# Altium PCB Stepper Board-v1.0.PcbDoc (part 5 of 8)
Units mil, origin at the board's own origin, x right, y up, seen from the top; angles counter-clockwise.
Board outline 6225.19 x 6531 mil, 4 copper layers (Top Layer, Layer-1, Layer-2, Bottom Layer), stack 61.654 mil thick; 410 components, 372 nets, 1464 pads, 1083 vias.
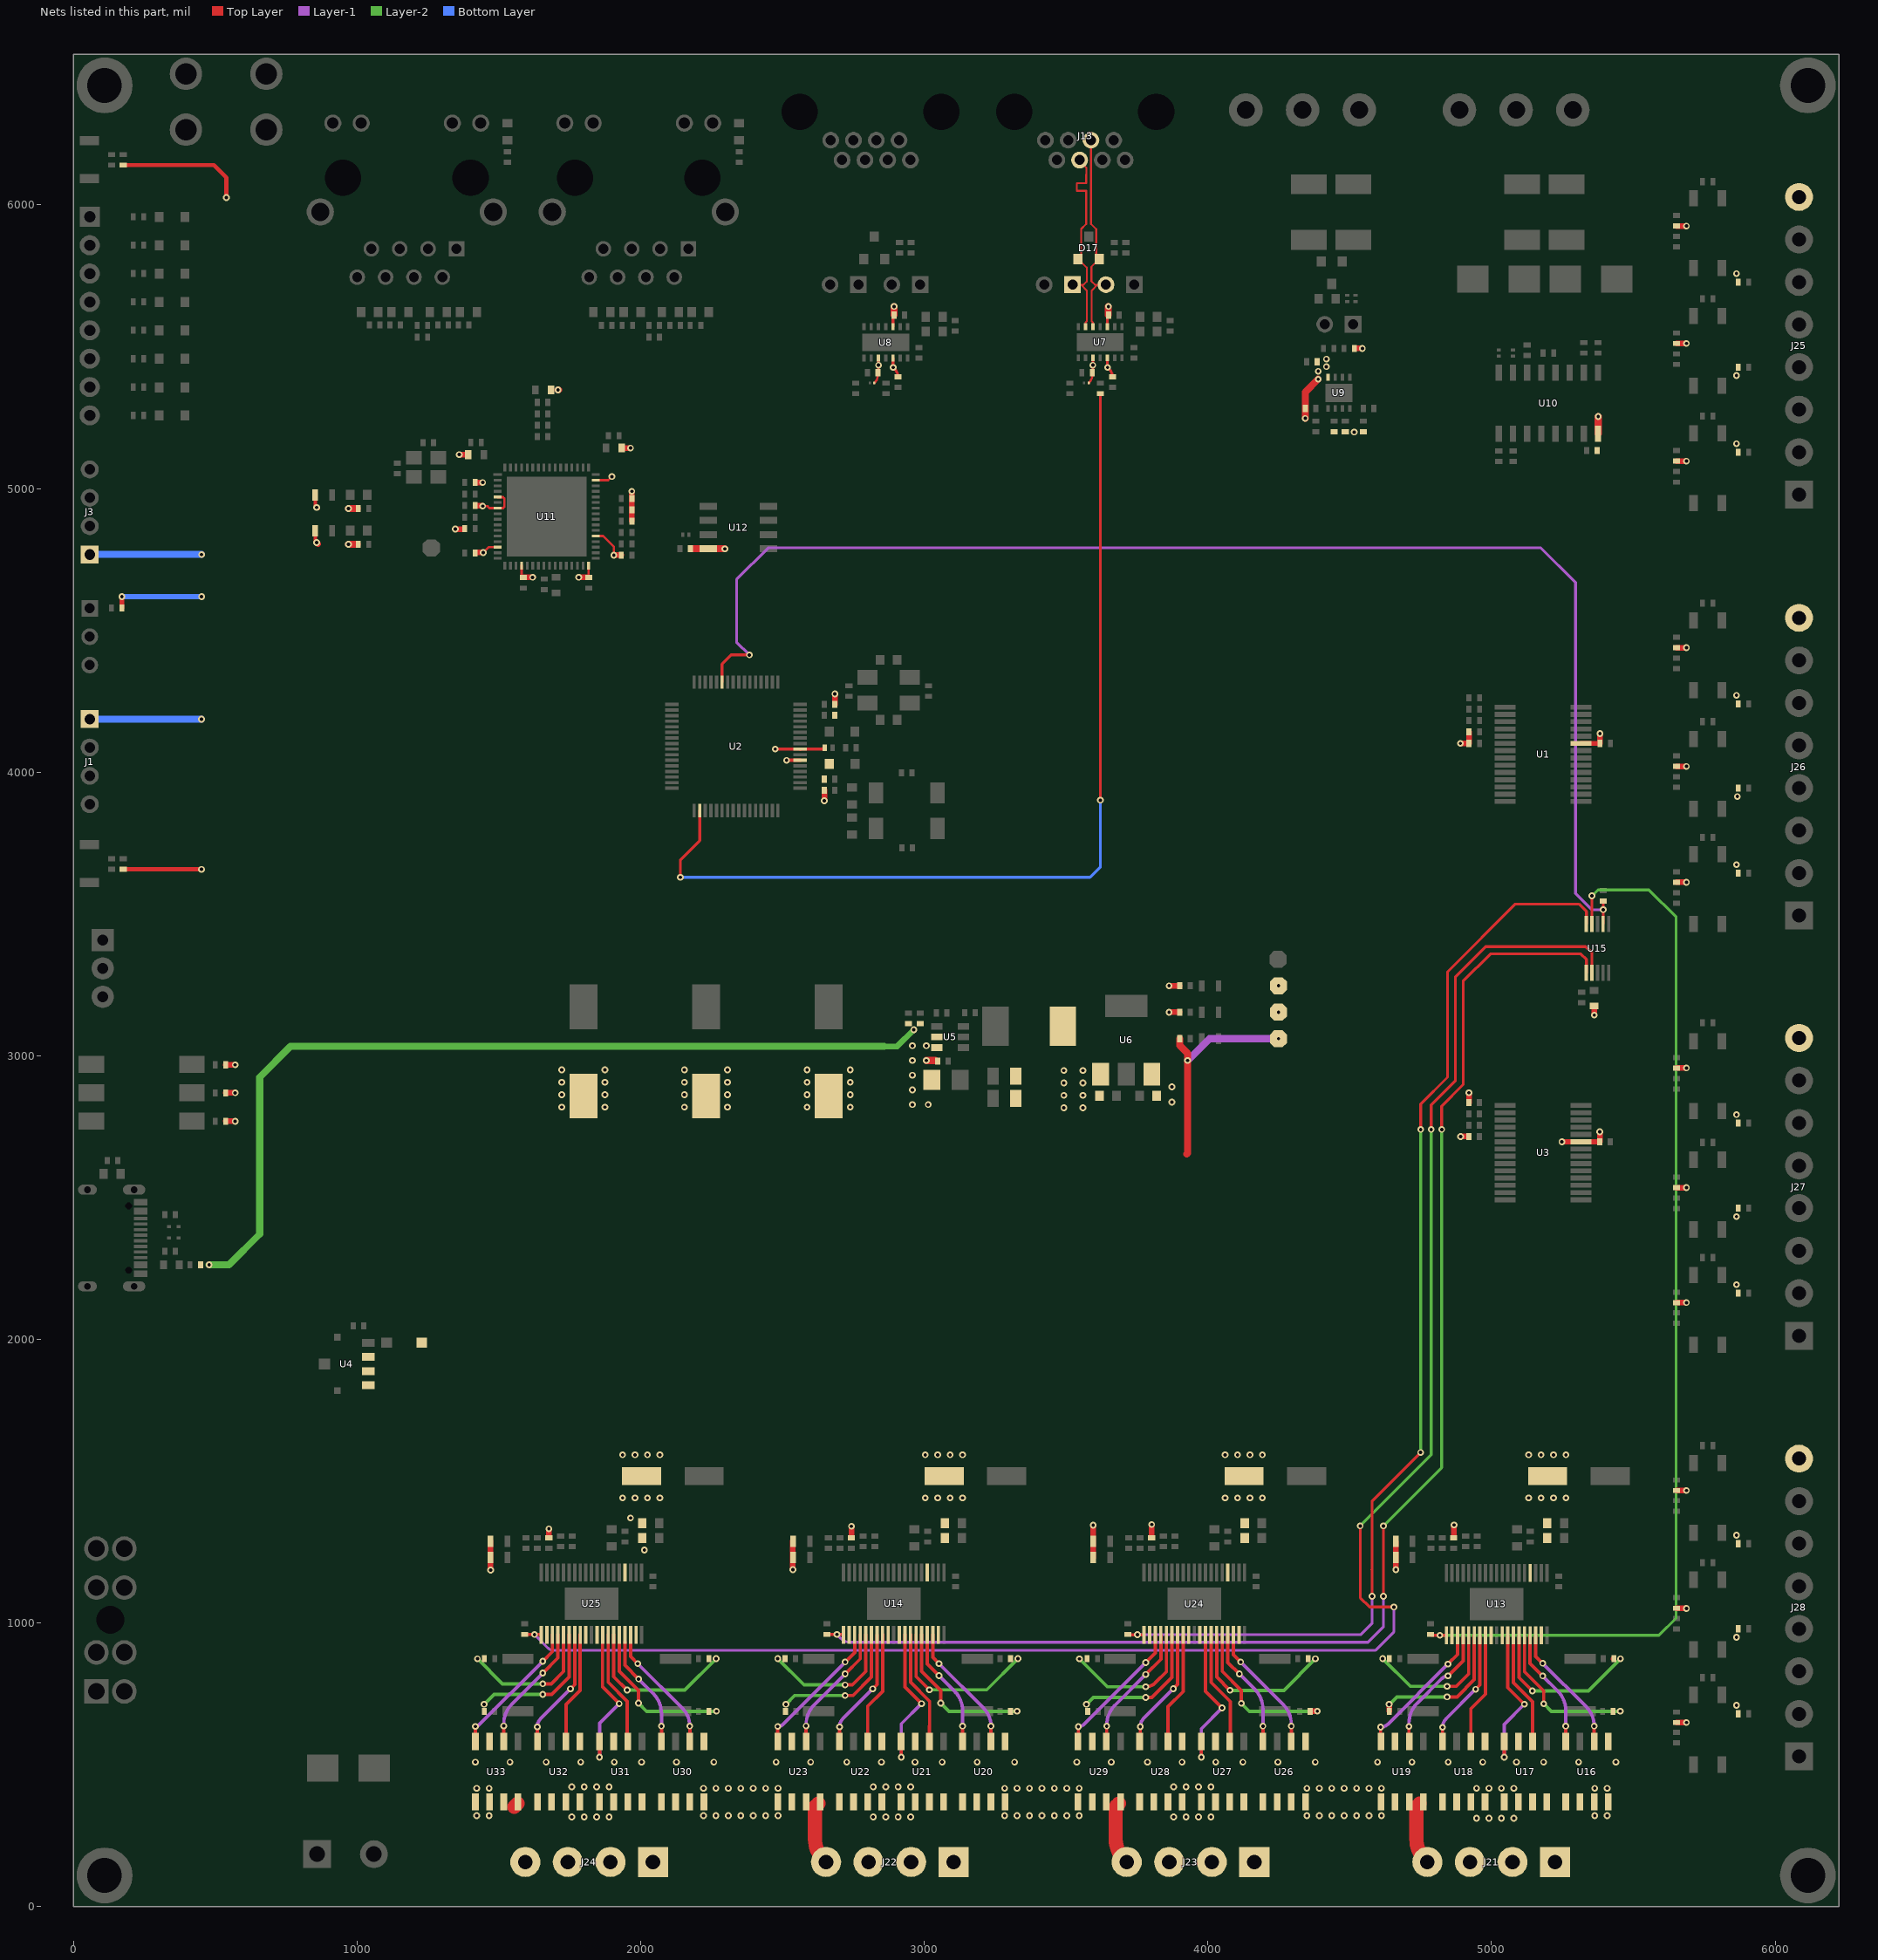
[diagram p4: the nets of this part, all layers, seen from the top]

## Part data (continued)
U34 U35 U36 U37 U38 U39 U40 U41 U42 U43 U44 U45: "Optoisolator Transistor Output 3750Vrms 1 Channel", Case/Package=SMD/SMT, Collector Emitter Saturation Voltage=200mV, Collector Emitter Voltage (VCEO)=80V, Current Transfer Ratio=600%, Forward Current=50mA, Forward Voltage=1.4V, Isolation Voltage=3.75kV, LCSC Part Number=C84196, Manufacturer=Isocom, Max Operating Temperature=100°C, Min Operating Temperature=-55°C, Power Dissipation=170mW, Reverse Breakdown Voltage=6V, Category=Optocouplers, ComponentLink1Description=https://datasheet.ciiva.com/26895/getdatasheetpartid-624485-26895717.pdf?src-supplier=Verical, ComponentLink1URL=https://datasheet.ciiva.com/26895/getdatasheetpartid-624485-26895717.pdf?src-supplier=Verical, ComponentLink2Description=https://datasheet.ciiva.com/29301/183289-da-01-en-optokoppler-is181-gb-29301106.pdf?src-supplier=Conrad, ComponentLink2URL=https://datasheet.ciiva.com/29301/183289-da-01-en-optokoppler-is181-gb-29301106.pdf?src-supplier=Conrad, Fall Time=18000ns, Item Type=Optocoupler, Lead Free="Lead Free", Manufacturer Part Number=IS181GB, Mount="Surface Mount", Number of Elements=1, Number of Pins=4, Pricing 1="1=0.55080, 10=0.34190, 25=0.33860, 50=0.33530, 100=0.19360, 250=0.19160, 500=0.18960, 1000=0.14750 (USD)", Radiation Hardening=No, Rise Time=18000ns, RoHS=Yes, RoHS Compliant=Yes, Stock 1=2922, Supplier 1="Arrow Electronics", Supplier Part Number 1=IS181GB
X1: library part "MC-306 32.7680K-A0:ROHS", "32.768kHz 12.5pF ±20ppm MC-306 Crystals ROHS", LCSC Part Number=C2650464, Manufacturer="Seiko Epson", ComponentLink1Description=LCSC, ComponentLink1URL=https://www.lcsc.com/product-detail/Crystals_Seiko-Epson-MC-306-32-7680K-A0-ROHS_C2650464.html, Item Type=Crystal, Manufacturer Part Number="MC-306 32.7680K-A0:ROHS"
X2: library part 5TJ480000XYLBC, "8MHz 18pF ±10ppm SMD5032-4P Crystals ROHS", LCSC Part Number=C2149247, Manufacturer=JYJE, Package=SMD5032-4P, ComponentLink1Description=LCSC, ComponentLink1URL=https://www.lcsc.com/product-detail/Crystals_JYJE-5TJ480000XYLBC_C2149247.html, Item Type=Crystal, Manufacturer Part Number=5TJ480000XYLBC
X3: library part X322525MRB4SI, "25MHz 贴片晶振 18pF ±10ppm ±20ppm SMD3225-4P Crystals ROHS", LCSC Part Number=C70593, Manufacturer=YXC, Item Type=Crystal, Manufacturer Part Number=X322525MRB4SI, RoHS=No, Supplier=LCSC

## Free pads (board coordinates)
  round 196.85 hole 122.05: MH1(109.33,6421.57) MH1(109.33,109.43) MH1(6115.86,6421.57) MH1(6115.86,109.43)

## Via types
v1: diameter 23.62, hole 11.81, Top Layer to Bottom Layer, 1081 vias
v2: diameter 23.62, hole 11.81, Top Layer to Bottom Layer, tented both sides, 2 vias

## Nets (pads, with @x,y where several pads share a name; then routed paths per layer and width w, separated by ;. In a path a pad name is that pad's centre, name@x,y a point inside that pad or via, vN(x,y) a via of type N, cw(c..) or ccw(c..) an arc to the next point about the centre after c; other vN are vias at no path point)
+3V3: C5.2 C6.2 C7.2 C8.2 C22.2 C24.2 C26.2 C29.2 C34.2 C43.2 C45.2 C47.2 C49.2 C51.2 C52.2 C53.2 D2.1 FB2.1 FB3.1 FB4.1 FB6.2 J1.1 J3.1 L1.1 LED4.1 LED5.1 LED6.1 LED7.1 LED8.1 LED9.1 LED10.1 LED11.1 LED12.1 LED13.1 R1.2 R7.2 R8.2 R12.2 R13.2 R17.2 R18.2 R21.2 R31.2 R32.2 R33.2 R39.1 R58.2 R59.2 R60.2 R61.2 R63.1 R71.2 R72.2 R73.1 R76.1 R77.1 R91.2 R95.2 R97.1 R98.1 R112.1 R113.1 TP3.1 U1.9 U2.6 U2.8 U3.9 U6.3 U7.5 U8.5 U9.8 U10.16 U11.5 U11.7 U11.14 U11.20 U11.32 U11.37 U11.47 U12.8 | length 4736.4
  Top Layer w8: C52.2@1416.05,5018.02 C52.2@1416.05,5021.52 ; v1(1442.7,4938.22) 1443.08,4937.84 1460,4937.84 1466.79,4931.05 U11.7@1495.32,4931.05 1514.12,4931.05 1518.8,4935.74 1518.8,4964.86 1514.12,4969.54 1496.2,4969.54 U11.5@1495.32,4970.42 ; v1(1444.55,4774.25) 1463.55,4793.25 U11.14@1495.32,4793.25 ; C43.2@1579.97,4687.61 U11.20@1579.97,4728.29 ; C45.2@1816.19,4687.38 U11.32@1816.19,4728.29 ; U11.37@1841.78,4832.62 1867.27,4832.62 1905.38,4794.51 v1(1905.38,4765) ; U11.47@1841.78,5029.48 1885.21,5029.48 v1(1898.01,5042.27)
  Top Layer w10: U2.8@2562.37,4081.16 2640.32,4081.16 2646.22,4087.06 L1.1@2646.22,4091 ; U8.5@2889.51,5460.37 2889.51,5428.63 ccw(c2891.84,5428.63) v1(2890.19,5426.98) 2895.73,5421.44 cw(c2868.06,5393.77) C26.2@2907.19,5393.77 ; C26.2@2909.19,5394.77 C26.2@2909.19,5395.75 ; v1@3645.59,5428.84 U7.5@3645.59,5460.58 ; v1(3646.28,5427.19) 3651.82,5421.65 cw(c3624.15,5393.98) C24.2@3663.28,5393.98
  Top Layer w12: v1@853.02,4814.34 LED5.1@853.02,4851.52 ; LED4.1@853.02,4977.52 853.02,4940.34 v1@863.84,4929.52 ; v1@2474,4082 2474.75,4081.25 2562.28,4081.25 U2.8@2562.37,4081.16 ; v1(2514.1,4041.79) U2.6@2562.37,4041.79
  Top Layer w15: R33.2@175,3657.5 175.25,3657.25 v1(451,3657.25) ; R77.1@175,6140.5 494.5,6140.5 539,6096 v1(539,6026)
  Top Layer w18: R1.2@170.62,4578.41 v1(170.62,4619) ; v1(5248.27,2696.68) U3.9@5315.68,2696.68 C6.2@5381.89,2696.68 ; U1.9@5315.68,4101.24 C5.2@5382.33,4101.24
  Top Layer w20: R32.2@536.5,2769 v1(570,2769) ; R31.2@536.5,2869 v1(570,2869) ; R21.2@536.5,2968 v1(570,2968) ; v1(857.02,4809.52) v1@863.02,4803.52 ; v1(1346.4,4857.03) R73.1@1376.7,4857.03 ; v1(1360.07,5119.81) 1360.07,5119.35 FB3.1@1391.54,5119.35 ; C51.2@1417.05,4938.91 v1@1442,4938.91 ; C47.2@1417.31,4774.25 v1@1441.55,4774.25 ; C52.2@1418.41,5021.52 v1(1442.7,5021.52) ; v1(1470.47,1186) LED12.1@1470.47,1230.54 LED13.1@1470.47,1288 ; C43.2@1586.55,4687.02 v1(1618.85,4687.02) v1@1620.85,4687.02 ; R113.1@1676.06,1304.13 v1(1676.06,1331.93) ; FB4.1@1682.8,5348.76 FB4.1@1683.56,5348 ; v1(1781.25,4687.02) C45.2@1815.55,4687.02 ; v1(1905.38,4765) C49.2@1931.5,4765 ; FB2.1@1932.56,5143 v1(1964.04,5143) ; R71.2@1968.5,4885 R72.2@1968.5,4925 R76.1@1968.5,4965 v1(1968.5,4990.11) ; v1(2536.47,1187.81) LED9.1@2536.47,1288 ; v1@2647.5,3899.11 C8.2@2647.5,3936.11 ; R18.2@2684.5,4239 v1@2684.5,4276 ; 2743.06,1309 v1(2743.06,1340.93) ; v1(3595.32,1344.73) 3595.32,1291.85 3595.9,1291.28 LED10.1@3595.9,1230.54 ; 3801.89,1309 v1(3801.89,1346.93) ; v1(3863,3246.55) R39.1@3900.5,3246.54 ; 4525.75,5494.22 v1(4544.68,5494.22) ; v1(4662.47,1187.81) LED7.1@4662.47,1286.02 ; R97.1@4867.89,1307.68 v1(4867.89,1345.6) ; v1(4890.49,4101.51) R7.2@4920.83,4101.51 R8.2@4920.83,4141.6 ; v1(4891,2715) R12.2@4920.26,2715 ; R13.2@4920.39,2834.63 v1(4920.39,2869.56) ; v1(5362.29,3143) 5362.29,3173.56 FB6.2@5363.79,3175.06 ; C6.2@5381.89,2696.68 v1(5381.89,2731.61) ; C5.2@5382.33,4101.24 v1(5382.33,4136.17)
  Top Layer w25: v1(969.52,4803.52) R95.2@1000.05,4803.52 ; v1(969.52,4929.52) R91.2@1000.05,4929.52 ; v1(1708.19,5348) v1@1710,5348 ; 2184.06,4787.52 U12.8@2238.25,4787.52 v1(2296.57,4787.52) ; v1(4343.26,5247.47) R58.2@4343.26,5282.43 4343.26,5340.2 v1(4388.73,5385.67) ; U10.16@5376.26,5194.19 v1(5376.26,5254)
  Bottom Layer w18: v1(170.62,4619) v1(451.47,4619)
  Bottom Layer w25: J1.1@57,4187 v1(451,4187) ; J3.1@57,4767.53 v1(451.47,4767.53)
  other v1: 3873.17,2836.15 3873.17,2890.16 4249,3246.54 2647.35,3899.11 2474,4081.25 2684.65,4276 857.02,4933.52 4516,5199 4388.73,5413.67 4417.73,5429.67 4417.73,5456.67
+5V: C18.2 C19.2 C20.2 C21.2 C23.1 C25.1 D15.1 D16.1 L2.2 NT17.1 NT18.1 NT19.1 NT20.1 NT21.1 NT22.1 NT23.1 NT24.1 NT25.1 NT26.1 NT27.1 NT28.1 R22.2 R35.2 R38.1 R42.1 R43.1 R132.2 R133.2 R134.2 R135.2 R136.2 R137.2 R150.2 R151.2 R152.2 R153.2 R154.2 R155.2 TP2.1 U6.1 U7.3 U7.10 U8.3 U8.10 | length 3910.7
  Top Layer w8: D16.1@2823.87,5372.05 ccw(c2793.39,5402.53) C25.1@2836.5,5402.53 ; D15.1@3579.96,5372.26 ccw(c3549.48,5402.74) C23.1@3592.59,5402.74
  Top Layer w10: C25.1@2838.32,5409.69 v1(2838.32,5435.03) U8.3@2838.32,5460.37 ; U8.10@2889.51,5570.61 2889.51,5601.59 cw(c2903.79,5601.59) R43.1@2893.69,5611.69 ; C23.1@3594.41,5409.89 U7.3@3594.41,5460.58 ; U7.10@3645.59,5570.81 R42.1@3645.59,5601.8
  Top Layer w20: v1(3863,3153.28) R38.1@3900.5,3153.27 ; R153.2@5652.39,648.79 v1(5687.31,648.79) ; R154.2@5652.39,1051 v1(5687.31,1051) ; R155.2@5652.39,1466.79 v1(5687.31,1466.79) ; R150.2@5652.39,2129.29 v1(5687.31,2129.29) ; R151.2@5652.39,2534.79 v1(5687.31,2534.79) ; R152.2@5652.39,2956.79 v1(5687.31,2956.79) ; R135.2@5652.39,3611.79 v1(5687.31,3611.79) ; R136.2@5652.39,4020.29 v1(5687.31,4020.29) ; R137.2@5652.39,4438.79 v1(5687.31,4438.79) ; R132.2@5652.39,5096.79 v1(5687.31,5096.79) ; R133.2@5652.39,5511.79 v1(5687.31,5511.79) ; R134.2@5652.39,5925.79 v1(5687.31,5925.79)
  Top Layer w25: R43.1@2893.19,5612.19 v1(2893.19,5642) ; R42.1@3649,5612.19 v1(3649,5642)
  Layer-2 w10: v1@2838.24,5434.94 v1(2838.32,5435.03)
  Layer-2 w20: 2858,3033 2904.31,3033 v1(2962.92,3091.6)
  Layer-2 w25: v1(478,2263) 548,2263 656.24,2371.25 656.24,2924.24 765,3033 2858,3033
  other v1: 5863.89,709.22 5863.89,949.36 5863.89,1309.22 5863.89,2192.55 5863.89,2432.7 5863.89,2792.22 3492.03,2816.52 3559.25,2816.52 3492.03,2860.35 3559.25,2860.35 3492.03,2904.18 3559.25,2904.18 3492.03,2948.01 3559.25,2948.01 4249,3153.27 5863.89,3673.89 5866.89,3914.03 5863.89,4270.89 5863.89,5158.22 5863.89,5398.36 3594.32,5435.03 5863.89,5758.22
+24V: C12.1 C13.1 C14.1 C15.2 C16.2 C72.1 C73.1 C74.2 C75.2 C76.2 C77.2 C87.1 C88.1 C89.2 C90.2 C91.2 C92.2 D13.2 J25.8 J26.8 J27.8 J28.8 R37.1 TP1.1 U4.1 U4.2 U4.3 U5.2 U5.3 U13.4 U14.4 U16.7 U16.8 U17.5 U17.6 U18.7 U18.8 U19.5 U19.6 U20.7 U20.8 U21.5 U21.6 U22.7 U22.8 U23.5 U23.6 U24.4 U25.4 U26.7 U26.8 U27.5 U27.6 U28.7 U28.8 U29.5 U29.6 U30.7 U30.8 U31.5 U31.6 U32.7 U32.8 U33.5 U33.6 | length 803.7
  Top Layer w25: v1(3007.21,2983.32) C16.2@3038.53,2983.32 ; R37.1@3900.5,3060 3900.5,3036.54 3928.5,3008.54 v1(3928.5,2983.04) 3928.5,2656.5 3925,2653
  Layer-1 w25: v1(3928.5,2983.04) 4005.46,3060 v1(4249,3060)
  other v1: 4947.01,311.08 4990.84,311.08 5034.67,311.08 5078.5,311.08 1756.67,315.78 1800.5,315.78 1844.33,315.78 1888.16,315.78 2820.01,315.78 2863.84,315.78 2907.67,315.78 2951.5,315.78 3879.01,315.78 3922.84,315.78 3966.67,315.78 4010.5,315.78 1421.36,320.47 1465.19,320.47 2221.19,320.47 2265.02,320.47 2308.85,320.47 2352.68,320.47 2396.51,320.47 2440.34,320.47 2484.17,320.47 3283.19,320.47 3327.02,320.47 3370.85,320.47 3414.68,320.47 3458.51,320.47 3502.34,320.47 3546.17,320.47 4349.19,320.47 4393.02,320.47 4436.85,320.47 4480.68,320.47 4524.51,320.47 4568.34,320.47 4612.17,320.47 5363.81,320.47 5407.64,320.47 1421.36,416.93 1465.19,416.93 2221.19,416.93 2265.02,416.93 2308.85,416.93 2352.68,416.93 2396.51,416.93 2440.34,416.93 2484.17,416.93 3283.19,416.93 3327.02,416.93 3370.85,416.93 3414.68,416.93 3458.51,416.93 3502.34,416.93 3546.17,416.93 4349.19,416.93 4393.02,416.93 4436.85,416.93 4480.68,416.93 4524.51,416.93 4568.34,416.93 4612.17,416.93 4947.01,416.93 4990.84,416.93 5034.67,416.93 5078.5,416.93 5363.81,416.93 5407.64,416.93 1756.67,421.63 1800.5,421.63 1844.33,421.63 1888.16,421.63 2820.01,421.63 2863.84,421.63 2907.67,421.63 2951.5,421.63 3879.01,421.63 3922.84,421.63 3966.67,421.63 4010.5,421.63 2013,1257 1963.91,1369.75 1936.14,1440.52 1979.97,1440.52 2023.8,1440.52 2067.63,1440.52 3003.14,1440.52 3046.97,1440.52 3090.8,1440.52 3134.63,1440.52 4060.57,1440.52 4104.4,1440.52 4148.23,1440.52 4192.06,1440.52 5131.14,1440.52 5174.97,1440.52 5218.8,1440.52 5262.63,1440.52 1936.14,1592.52 1979.97,1592.52 2023.8,1592.52 2067.63,1592.52 3003.14,1592.52 3046.97,1592.52 3090.8,1592.52 3134.63,1592.52 4060.57,1592.52 4104.4,1592.52 4148.23,1592.52 4192.06,1592.52 5131.14,1592.52 5174.97,1592.52 5218.8,1592.52 5262.63,1592.52 1721.52,2818.89 1873.52,2818.89 2154.02,2818.89 2306.02,2818.89 2586.52,2818.89 2738.52,2818.89 2958.06,2827.52 3013.71,2827.52 1721.52,2862.72 1873.52,2862.72 2154.02,2862.72 2306.02,2862.72 2586.52,2862.72 2738.52,2862.72 2958.06,2879.46 1721.52,2906.55 1873.52,2906.55 2154.02,2906.55 2306.02,2906.55 2586.52,2906.55 2738.52,2906.55 2958.06,2931.39 1721.52,2950.38 1873.52,2950.38 2154.02,2950.38 2306.02,2950.38 2586.52,2950.38 2738.52,2950.38 2958.06,2983.32 2958.06,3035.26 3007.21,3035.26
A1HS-1: U13.36 U16.2 | length 455.9
  Top Layer w12: U13.36@5155.91,956.02 5155.91,882.15 v1(5180.64,857.41) ; U16.2@5362,581.3 v1(5362,636)
  Layer-1 w12: v1(5180.64,857.41) 5333.68,704.37 cw(c5265.31,636) v1(5362,636)
A1HS-2: U24.36 U26.2 | length 456.3
  Top Layer w12: U24.36@4089.91,957.35 4089.91,887.62 v1(4115.5,862.02) ; U26.2@4294,581.3 v1(4294,636)
  Layer-1 w12: v1(4115.5,862.02) 4264.71,712.81 cw(c4194,642.1) 4294,642.1 v1(4294,636)
A1HS-3: U14.36 U20.2 | length 457.8
  Top Layer w12: U14.36@3029.91,958 3029.91,878.38 v1(3052,856.28) ; U20.2@3235,581.3 v1(3235,636)
  Layer-1 w12: v1(3052,856.28) 3208.64,699.65 ; 3208.65,699.63 cw(c3144.99,636) v1(3235,636)
A1HS-4: U25.36 U30.2 | length 434
  Top Layer w12: U25.36@1963.91,932.5 1963.91,881.72 v1(1989.35,856.28) ; U30.2@2173,581.3 v1(2173,636)
  Layer-1 w12: v1(1989.35,856.28) 2147.1,698.53 cw(c2084.57,636) v1(2173,636)
A1LS-1: U13.35 U16.4 | length 422.5
  Top Layer w12: U13.35@5136.23,956.02 5136.23,857.41 v1(5180.64,813) ; U16.4@5262,581.3 v1(5262,636)
  Layer-1 w12: v1(5180.64,813) 5232.71,760.93 cw(c5162,690.22) 5262,690.22 v1(5262,636)
A1LS-2: U24.35 U26.4 | length 423
  Top Layer w12: U24.35@4070.23,957.35 4070.23,860.77 v1(4111,820) ; U26.4@4194,581.3 v1(4194,636)
  Layer-1 w12: v1(4111,820) 4164.71,766.29 cw(c4094,695.58) 4194,695.58 v1(4194,636)
A1LS-3: U14.35 U20.4 | length 424.1
  Top Layer w12: U14.35@3010.23,958 3010.23,855.77 v1(3052,814) ; U20.4@3135,581.3 v1(3135,636)
  Layer-1 w12: v1(3052,814) 3105.71,760.29 cw(c3035,689.58) 3127.55,727.45 cw(c3035,689.58) 3135,689.58 v1(3135,636)
A1LS-4: U25.35 U30.4 | length 400.2
  Top Layer w12: U25.35@1944.23,932.5 1944.23,850.44 v1(1992.52,802.14) ; U30.4@2073,581.3 v1(2073,636)
  Layer-1 w12: v1(1992.52,802.14) 2043.71,750.96 cw(c1973,680.25) 2073,680.25 v1(2073,636)
A2HS-1: U13.31 U17.4 | length 537.9
  Top Layer w12: v1(5044.67,526.6) U17.4@5044.67,581.3 ; U13.31@5057.49,956.02 5057.49,771.82 v1(5115.97,713.33)
  Layer-1 w12: v1(5044.67,526.6) 5044.67,642.03 v1(5115.97,713.33)
A2HS-2: U24.31 U27.4 | length 524.9
  Top Layer w12: v1@3976.67,528.58 U27.4@3976.67,568.18 ; U24.31@3991.49,957.35 3991.49,758.7 v1(4049.97,700.21)
  Layer-1 w12: v1(3976.67,526.6) 3976.67,626.9 v1(4049.97,700.21)
A2HS-3: U14.31 U21.4 | length 540.5
  Top Layer w12: v1@2918.67,528.58 U21.4@2918.67,583.28 ; U14.31@2931.49,958.68 U14.31@2931.49,958 2931.49,773.8 v1(2989.97,715.31)
  Layer-1 w12: v1(2918.67,526.6) 2918.67,644 v1(2989.97,715.31)
A2HS-4: U25.31 U31.4 | length 539
  Top Layer w10: 1865.49,773.8 U25.31@1865.49,958
  Top Layer w12: v1@1854.67,528.58 U31.4@1854.67,583.28 ; 1865.49,773.8 v1(1923.97,715.31)
  Layer-1 w12: v1(1854.67,526.6) 1854.67,646 v1(1923.97,715.31)
A2LS-1: U13.32 U17.2 | length 402.7
  Top Layer w12: U13.32@5077.17,956.02 5077.17,788.84 5144.67,721.33 U17.2@5144.67,581.3
A2LS-2: U24.32 U27.2 | length 402.7
  Top Layer w12: U24.32@4011.17,957.35 4011.17,790.16 4078.67,722.66 U27.2@4078.67,582.63
A2LS-3: U14.32 U21.2 | length 457.4
  Top Layer w12: U14.32@2951.17,958 2951.17,790.81 3018.67,723.31 U21.2@3018.67,583.28 ; U21.2@3017.67,581.3 3017.67,636
A2LS-4: U25.32 U31.2 | length 402.7
  Top Layer w12: U25.32@1885.17,958 1885.17,790.81 1952.67,723.31 U31.2@1952.67,583.28
AISENN-1: NT2.1 U13.33 | length 575
  Top Layer w12: U13.33@5096.86,956.02 5096.86,875.3 5096.86,807.17 v1(5144,760.02)
  Top Layer w20: NT2.1@5429.5,872.52 NT2.1@5430.5,873.52
  Layer-2 w12: v1(5144,760.02) 5341.5,760.02 v1(5455,873.52)
AISENN-2: NT10.1 U24.33 | length 561.6
  Top Layer w12: U24.33@4030.86,957.35 4030.86,809.49 v1(4078,762.35)
  Layer-2 w12: v1(4078,762.35) 4267.83,762.35 v1(4379,873.52)
AISENN-3: NT6.1 U14.33 | length 571.3
  Top Layer w12: U14.33@2970.86,958 2970.86,811.14 v1(3018,764)
  Layer-2 w12: v1(3018,764) 3220.17,764 v1(3330.17,874)
AISENN-4: NT14.1 U25.33 | length 574.7
  Top Layer w12: U25.33@1904.86,958 1904.86,810.14 v1(1952,763)
  Layer-2 w12: v1(1952,763) 2155.48,763 v1@2265.69,873.21
  Layer-2 w20: v1@2265.69,873.21 v1(2265.69,874)
AISENP-1: NT1.1 U13.34 | length 628
  Top Layer w10: 5115.97,877.4 U13.34@5115.97,955.46
  Top Layer w12: U13.34@5116.54,956.02 5116.54,827.49 5184,760.02 v1(5184,715.02)
  Layer-2 w12: v1(5184,715.02) 5210.54,688.48 v1(5454,688.48)
AISENP-2: NT9.1 U24.34 | length 573
  Top Layer w12: U24.34@4050.54,957.35 4050.54,828.81 4118,761.35 v1(4118,716.35)
  Top Layer w20: NT9.1@4361.5,688.48 v1(4386,688.48)
  Layer-2 w12: v1(4118,716.35) 4145.87,688.48 v1(4386,688.48)
AISENP-3: NT5.1 U14.34 | length 549.8
  Top Layer w12: U14.34@2990.54,958 2990.54,829.46 3058,762 v1(3058,717)
  Layer-2 w12: v1(3058,717) 3086.52,688.48 v1(3327,688.48)
AISENP-4: NT13.1 U25.34 | length 553.8
  Top Layer w12: U25.34@1924.54,958 1924.54,829.46 1992,762 v1(1992,717)
  Layer-2 w12: v1(1992,717) 2020.52,688.48 v1@2265,688.48
  other v1: 2267,688.48
AOUT1-1: J21.1 U13.37 U16.1 U16.5 U16.6
  other v1: 5307,509 5438.81,509
AOUT1-2: J23.1 U24.37 U26.1 U26.5 U26.6
  other v1: 4246.67,509 4378.48,509
AOUT1-3: J22.1 U14.37 U20.1 U20.5 U20.6
  other v1: 3186.34,509 3318.14,509
AOUT1-4: J24.1 U25.37 U30.1 U30.5 U30.6
  other v1: 2126,509 2257.81,509
AOUT2-1: J21.2 U13.30 U17.3 U17.7 U17.8
  other v1: 5087.83,509 5183.64,509
AOUT2-2: J23.2 U24.30 U27.3 U27.7 U27.8
  other v1: 4027.5,509 4123.3,509
AOUT2-3: J22.2 U14.30 U21.3 U21.7 U21.8
  other v1: 2967.16,509 3062.97,509
AOUT2-4: J24.2 U25.30 U31.3 U31.7 U31.8
  other v1: 1906.83,509 2002.64,509
B1HS-1: U13.27 U18.2 | length 394.7
  Top Layer w12: U18.2@4927.33,582.63 4927.33,697.33 4978.75,748.75 U13.27@4978.75,956.02
B1HS-2: U24.27 U28.2 | length 396.8
  Top Layer w12: U28.2@3859.33,582.63 3859.33,704.33 3912.75,757.75 U24.27@3912.75,957.35
B1HS-3: U14.27 U22.2 | length 397.8
  Top Layer w12: U22.2@2800.33,582.63 2800.33,706.33 2852.75,758.75 U14.27@2852.75,958.68
B1HS-4: U25.27 U32.2 | length 398.7
  Top Layer w12: U32.2@1735.67,581.3 1737,582.63 1737,713 1786.25,762.25 U25.27@1786.25,959
B1LS-1: U13.26 U18.4 | length 427.5
  Top Layer w12: U18.4@4827.33,581.3 v1(4827.33,632) ; v1(4944,766) 4959.06,781.06 U13.26@4959.06,956.02
  Layer-1 w12: v1(4827.33,632) cw(c4869.18,632) 4827.75,637.86 cw(c4869.18,632) 4839.59,661.59 v1(4944,766)
B1LS-2: U24.26 U28.4 | length 427.5
  Top Layer w12: U28.4@3761.33,583.12 v1(3761.33,633.83) ; v1(3878,767.83) 3893.06,782.88 U24.26@3893.06,957.85
  Layer-1 w12: v1(3761.33,633.83) cw(c3803.18,633.83) 3761.75,639.69 cw(c3803.18,633.83) 3773.59,663.42 v1(3878,767.83)
B1LS-3: U14.26 U22.4 | length 427.5
  Top Layer w12: U22.4@2701.33,582.78 v1(2701.33,633.48) ; v1(2818,767.48) 2833.06,782.53 U14.26@2833.06,957.5
  Layer-1 w12: v1(2701.33,633.48) cw(c2743.18,633.48) 2701.75,639.34 cw(c2743.18,633.48) 2713.59,663.07 v1(2818,767.48)
B1LS-4: U25.26 U32.4 | length 427.5
  Top Layer w12: U32.4@1635.33,582.78 v1(1635.33,633.48) ; v1(1752,767.48) 1767.06,782.53 U25.26@1767.06,957.5
  Layer-1 w12: v1(1635.33,633.48) cw(c1677.18,633.48) 1635.75,639.34 cw(c1677.18,633.48) 1647.59,663.07 v1(1752,767.48)
B2HS-1: U13.22 U19.4 | length 497.8
  Top Layer w12: U19.4@4609,580.02 v1(4609,632.72) v1@4609,634.72 ; v1(4846.73,855.02) 4880.33,888.62 U13.22@4880.32,956.02
  Layer-1 w12: v1(4609,632.72) ccw(c4609,669.98) 4635.34,643.64 v1(4846.73,855.02)
B2HS-2: U24.22 U29.4 | length 498.6
  Top Layer w12: U29.4@3543,581.35 v1(3543,634.05) v1@3543,636.05 ; v1(3780.73,860.35) 3814.33,893.94 U24.22@3814.32,957.35
  Layer-1 w12: v1@3545.44,635.06 cw(c3543,637.51) v1(3543,634.05) ccw(c3543,661.65) 3562.52,642.13 v1(3780.73,860.35)
B2HS-3: U14.22 U23.4 | length 469.9
  Top Layer w12: U23.4@2483,582 v1(2483,634.7) v1@2483,636.7 ; v1(2720.73,862) 2754.33,895.6 U14.22@2754.33,932.5
  Layer-1 w12: v1(2483,634.7) ccw(c2483,659.89) 2500.81,642.08 v1(2720.73,862)
B2HS-4: U25.22 U33.4 | length 492
  Top Layer w12: U33.4@1417,582 v1(1417,634.7) ; v1(1654.73,865) 1688.33,898.6 U25.22@1688.32,958
  Layer-1 w12: v1(1417,634.7) ccw(c1417,652.64) 1420.49,635.04 ccw(c1417,652.64) 1429.69,639.96 v1(1654.73,865)
B2LS-1: U13.23 U19.2 | length 456.9
  Top Layer w12: U19.2@4709,580.02 v1(4709,634.72) ; v1(4846.73,813.02) 4900.01,866.3 U13.23@4900.01,956.02
  Layer-1 w12: v1(4709,634.72) 4709,646.58 cw(c4809,646.58) 4738.29,717.29 4825.04,804.04 cw(c4846.73,782.35) v1(4846.73,813.02)
B2LS-2: U24.23 U29.2 | length 450.8
  Top Layer w12: U29.2@3643,581.35 v1(3643,636.05) ; v1(3780.73,818.35) 3834.01,871.62 U24.23@3834.01,957.35
  Layer-1 w12: v1(3643,636.05) 3643,639.2 cw(c3743,639.2) 3672.29,709.91 v1(3780.73,818.35)
B2LS-3: U14.23 U23.2 | length 450.8
  Top Layer w12: U23.2@2583,582 v1(2583,636.7) ; v1(2720.73,820) 2774.01,873.28 U14.23@2774.01,958
  Layer-1 w12: v1(2583,636.7) 2583,640.85 cw(c2683,640.85) 2612.29,711.56 v1(2720.73,820)
B2LS-4: U25.23 U33.2 | length 450.8
  Top Layer w12: U33.2@1517,582 v1(1517,636.7) ; v1(1654.73,823) 1708.01,876.28 U25.23@1708.01,958
  Layer-1 w12: v1(1517,636.7) 1517,643.85 cw(c1617,643.85) 1546.29,714.56 v1(1654.73,823)
BEMF-1: C70.1 U13.20 U15.4 | length 3831.1
  Top Layer w10: C70.1@4785,959.5 4787.98,956.52 v1(4818,956.52) U13.20@4840.95,956.52 ; U15.4@5354.11,3465.23 v1(5354.11,3563.61)
  Layer-2 w10: v1(4818,956.52) 5590.52,956.52 5651,1017 5651,3489 5555,3585 5375.49,3585 v1(5354.11,3563.61)
BEMF-2: C85.1 U15.5 U24.20 | length 3981.5
  Top Layer w10: C85.1@3727.6,958.35 v1(3751.5,958.35) U24.20@3774.45,958.35 ; 3734,957.85 U24.20@3774.45,957.85 ; 4578,1188 4579,1189 4579,1430 v1(4750,1601) ; v1(4579,1094) 4579,1187.81 ; v1(4750.16,2740) 4750.16,2829.16 4845,2924 4845,3296 5084,3535 5308,3535 5334.42,3508.58 U15.5@5334.42,3465.23
  Layer-1 w10: v1(3751.5,958.35) 4538.35,958.35 4579,999 v1(4579,1094)
  Layer-2 w10: v1@4750.16,1601.16 v1(4750.16,2740)
BEMF-3: C71.1 U14.20 U15.6 | length 4928.1
  Top Layer w10: C71.1@2668.1,959.18 v1(2692,959.18) U14.20@2714.95,959.18 ; v1(4619,1094) v1(4619,1342) ; v1(4824.48,2740) 4824.48,2822.48 4900,2898 4900,3263 4996,3359 5315,3359 5334.42,3339.58 U15.6@5334.42,3292.01
  Layer-1 w10: v1(2692,959.18) 2705.59,945.58 ccw(c2738.39,978.39) 2738.39,932 4564,932 4619,987 v1(4619,1094)
  Layer-2 w10: v1(4619,1342) 4824.48,1547.48 v1(4824.48,2740)
BEMF-4: C86.1 U15.7 U25.20 | length 6321.8
  Top Layer w10: C86.1@1601.6,959 v1(1625.5,959) U25.20@1648.45,959 ; 1608,958.5 1648.45,958.5 U25.20@1648.95,958 ; v1(4537,1342) 4537,1089 4570,1056 v1(4656,1056) ; v1(4787.32,2740) 4787.32,2826.32 4873,2912 4873,3279 4979,3385 5332,3385 5354.11,3362.89 U15.7@5354.11,3292.01
  Layer-1 w10: v1(1625.5,959) 1673.52,910.98 ccw(c1692.79,930.25) 1692.79,903 4590,903 4656,969 v1(4656,1056)
  Layer-2 w10: v1(4537,1342) 4787.32,1592.32 v1(4787.32,2740)
BEMF-ADC-RDY: R107.2 U2.27 U15.2 | length 4811
  Top Layer w10: U2.27@2286.79,4317.37 2286.79,4380.79 2319.19,4413.19 v1(2383,4413.19) ; U15.2@5393.46,3465.25 5393.77,3488.78 v1@5393.77,3515 ; R107.2@5393.79,3545.12 5393.9,3545.02 5393.9,3515.1 v1(5394,3515)
  Layer-1 w10: v1(2383,4413.19) 2338,4458.19 2338,4679 2450,4791 5174,4791 5296,4669 5296,3572 5353,3515 v1(5394,3515)
BISENN-1: NT4.1 U13.24 | length 497.9
  Top Layer w12: v1(4843.48,776.34) 4876.49,776.34 ; 4876.6,776.77 4919.69,819.85 U13.24@4919.69,956.02
  Layer-2 w12: v1(4616.17,874.02) 4713.86,776.34 v1(4843.48,776.34)
BISENN-2: NT12.1 U24.24 | length 497.2
  Top Layer w12: v1(3780.48,774.66) ccw(c3780.48,822.97) 3814.62,788.8 3853.69,827.86 U24.24@3853.69,957.35
  Layer-2 w12: v1(3547.17,873.35) 3645.86,774.66 v1@3780.89,774.66
BISENN-3: NT8.1 U14.24 | length 497.9
  Top Layer w12: v1(2720.73,781.32) 2746.49,781.32 2793.69,828.52 U14.24@2793.69,958
  Layer-2 w12: v1(2483.17,874) 2575.86,781.32 v1(2720.73,781.32)
BISENN-4: NT16.1 U25.24 | length 487.4
  Top Layer w12: v1(1654.73,785.32) 1684.49,785.32 1727.69,828.52 U25.24@1727.69,958
  Layer-2 w12: v1(1424.17,873.52) 1512.38,785.32 v1(1654.73,785.32)
BISENP-1: NT3.1 U13.25 | length 513.1
  Top Layer w12: v1(4843.48,739.02) 4878.54,739.02 ; 4880,740.66 4939.38,800.04 U13.25@4939.38,956.02
  Top Layer w20: NT3.1@4639.69,688.48 v1@4639.69,712.98
  Layer-2 w12: v1@4640.69,712.98 4666.73,739.02 v1(4843.48,739.02)
  other v1: 4638.69,712.98
BISENP-2: NT11.1 U24.25 | length 488.5
  Top Layer w12: v1(3780.48,737.35) 3802.54,737.35 3873.38,808.18 U24.25@3873.38,957.35
  Layer-2 w12: v1(3571.69,712.98) 3596.06,737.35 v1@3778.71,737.35
BISENP-3: NT7.1 U14.25 | length 490.2
  Top Layer w12: v1(2720.73,744) 2748.54,744 2813.38,808.84 U14.25@2813.38,958
  Layer-2 w12: v1(2512,712.98) 2543.02,744 v1(2720.73,744)
BISENP-4: NT15.1 U25.25 | length 488.7
  Top Layer w12: v1(1654.73,748) 1686.54,748 1747.38,808.84 U25.25@1747.38,958
  Layer-2 w12: v1(1447.5,712.98) 1482.52,748 v1(1654.73,748)
BOUT1-1: J21.3 U13.28 U18.1 U18.5 U18.6
  other v1: 4847.36,509 4969.16,509
BOUT1-2: J23.3 U24.28 U28.1 U28.5 U28.6
  other v1: 3787.02,509 3908.83,509
BOUT1-3: J22.3 U14.28 U22.1 U22.5 U22.6
  other v1: 2726.69,509 2848.5,509
BOUT1-4: J24.3 U25.28 U32.1 U32.5 U32.6
  other v1: 1666.36,509 1788.16,509
BOUT2-1: J21.4 U13.21 U19.3 U19.7 U19.8 | length 222.9
  Top Layer w50: 4746.81,363.19 4735,351.38 4735,237.42 ccw(c4835,237.42) 4764.29,166.71 J21.4@4774,157
  other v1: 4598,509 4719.81,509
BOUT2-2: J23.4 U24.21 U29.3 U29.7 U29.8 | length 222.9
  Top Layer w50: U29.8@3686.48,363.19 3674.67,351.38 3674.67,237.42 ccw(c3774.67,237.42) 3703.96,166.71 J23.4@3713.67,157
  other v1: 3537.67,509 3659.48,509
BOUT2-3: J22.4 U14.21 U23.3 U23.7 U23.8 | length 222.9
  Top Layer w50: U23.8@2626.14,363.19 2614.33,351.38 2614.33,237.42 ccw(c2714.33,237.42) 2643.62,166.71 J22.4@2653.33,157
  other v1: 2477.34,509 2599.14,509
BOUT2-4: J24.4 U25.21 U33.3 U33.7 U33.8 | length 30.4
  Top Layer w50: 1554,351.38 U33.8@1565.81,363.19 ; J24.4@1583.29,166.71 J24.4@1593,157
  other v1: 1417,509 1538.81,509
CAN1_N: D17.2 J10.2 J13.5 U7.12 | length 736.1
  Top Layer w6.5: J13.5@3587.57,6228.51 3587.57,6107.49 3587.65,6107.41
  Top Layer w6.66: 3587.65,6107.41 3587.65,6066.05 3587.65,5943 3587.65,5933 3606.12,5914.53 3606.12,5820.54 D17.2@3617.05,5809.61 3589.3,5781.87 3589.3,5730.94 3601.26,5718.98 3610.78,5718.98 ; U7.12@3594.41,5570.81 3594.41,5585.95 3589.91,5590.46 3589.91,5698.11 3610.78,5718.98 ; J10.2@3640.51,5718.98 3610.78,5718.98
CAN1_P: D17.1 J9.1 J13.4 U7.13 | length 739.1
  Top Layer w6.5: J13.4@3547.53,6155.47 3571.07,6131.93 3571.07,6107.49 3570.99,6107.41
  Top Layer w6.66: J9.1@3522.64,5718.98 3552.36,5718.98 ; U7.13@3568.82,5570.81 3568.82,5585.95 3573.24,5590.38 3573.24,5698.11 3552.36,5718.98 ; 3570.99,6107.41 3570.99,6095.52 3570.99,6076.83 3538,6076.83 3538,6050.16 3570.99,6050.16 3570.99,6046.83 3570.99,5933 3553.17,5915.18 3553.17,5820.54 D17.1@3542.25,5809.61 3572.64,5779.22 3572.64,5729.74 3561.89,5718.98 3552.36,5718.98
CAN1_RX: R44.2 U2.50 | length 3428.9
  Top Layer w10: v1(2140,3629) 2140,3691 2208.05,3759.05 U2.50@2208.05,3864.63 ; v1(3620.91,3901) R44.2@3620.91,5334.77
  Bottom Layer w10: v1(2140,3629) 3584,3629 3620.91,3665.91 v1(3620.91,3901)